# Altium PCB AudioMoth-v1.2.PcbDoc (part 3 of 4)
Units mil, origin at the board's own origin, x right, y up, seen from the top; angles counter-clockwise.
Board outline 4924.42 x 1891.72 mil, 4 copper layers (Top Layer, Layer 1, Layer 2, Bottom Layer), stack 61.651 mil thick; 148 components, 140 nets, 637 pads, 349 vias.
Unrouted connection lines stored in the file: 32.
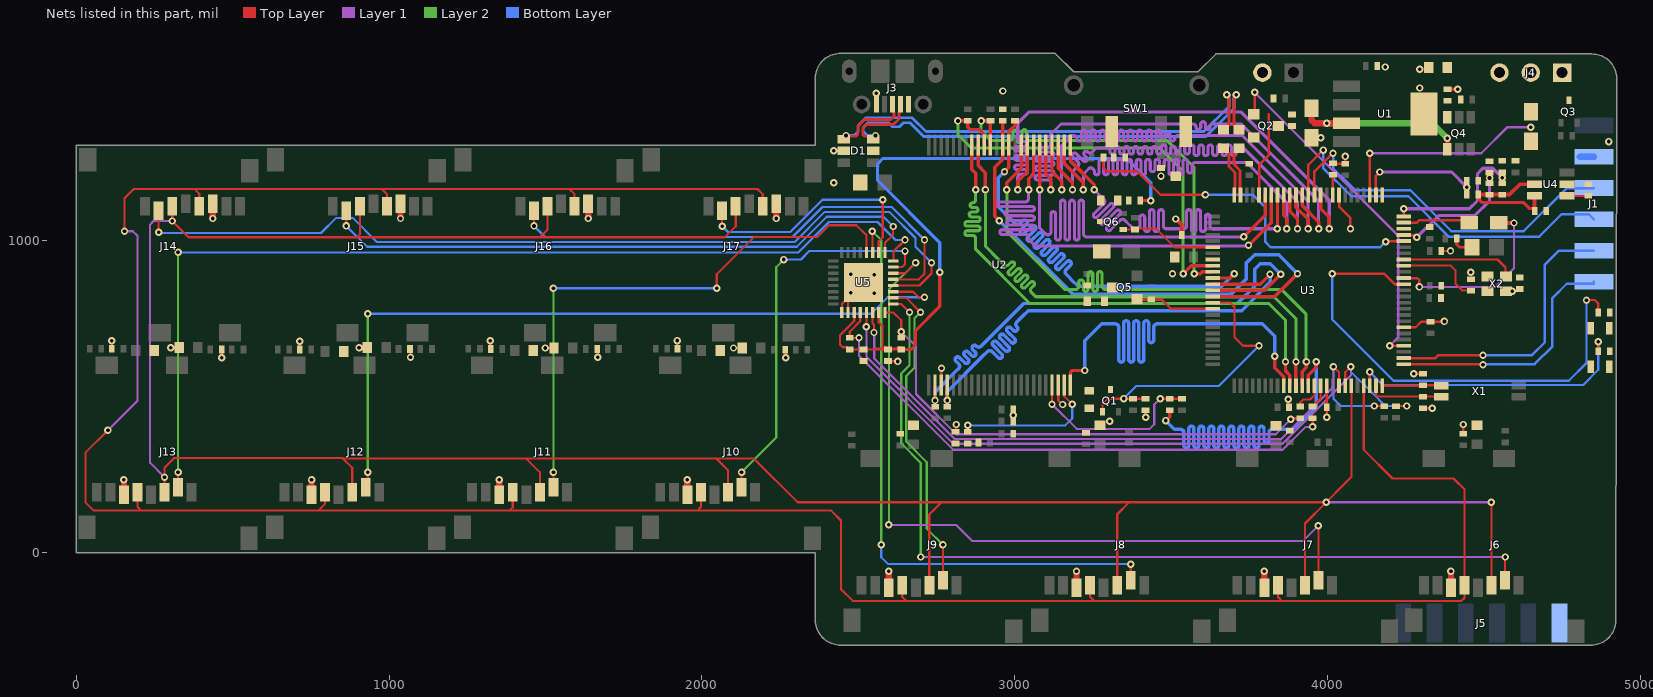
[diagram p4: the nets of this part, all layers, seen from the top]

## Via types
v1: diameter 23.62, hole 11.81, Top Layer to Bottom Layer, tented both sides, 344 vias
v2: diameter 23.62, hole 11.81, Top Layer to Bottom Layer, 5 vias

## Nets (pads, with @x,y where several pads share a name; then routed paths per layer and width w, separated by ;. In a path a pad name is that pad's centre, name@x,y a point inside that pad or via, vN(x,y) a via of type N, cw(c..) or ccw(c..) an arc to the next point about the centre after c; other vN are vias at no path point) (continued)
A8: U2.8 U3.61 | length 1955.1
  Top Layer w11: v1(3009.67,1161.59) 3009.67,1188.32 3040.46,1219.11 U2.8@3040.45,1304.63 ; U3.61@3977.85,1144.84 3977.85,1100.71 4005.67,1072.9 v1(4005.67,1036.57)
  Layer 1 w9.9: v1(3009.67,1161.59) 3009.67,1180.91 3009.67,1200.76 cw(c3019.57,1200.76) 3019.57,1210.66 3032.53,1210.66 ccw(c3032.53,1218.11) 3032.53,1225.56 3007.12,1225.56 cw(c3007.12,1233.01) 3007.12,1240.46 3032.53,1240.46 ccw(c3032.53,1247.91) 3032.53,1255.36 3007.12,1255.36 cw(c3007.12,1262.81) 3007.12,1270.26 3032.53,1270.26 ccw(c3032.53,1277.71) 3032.53,1285.16 3007.12,1285.16 cw(c3007.12,1292.61) 3007.12,1300.06 3032.29,1300.06 ccw(c3032.29,1307.51) 3032.29,1314.96 3019.57,1314.96 cw(c3019.57,1324.86) 3009.67,1324.86 3009.67,1367.08 3009.67,1374.08 3044.9,1409.31 3723.95,1409.31 4005.67,1127.58 v1(4005.67,1036.57)
A9: U2.7 U3.69 | length 1956.7
  Top Layer w11: v1@3044.43,1156.59 v1(3044.43,1161.59) 3044.43,1196.08 3060.14,1211.79 U2.7@3060.14,1304.63 ; v1(3747.54,983.42) 3820.37,1056.25 U3.69@3820.37,1144.84
  Layer 1 w9.9: v1(3044.43,1161.59) 3044.43,1150.78 3044.43,1132.57 cw(c3034.53,1132.57) 3034.53,1122.67 2948.78,1122.67 ccw(c2948.78,1115.22) 2948.78,1107.77 3055.47,1107.77 cw(c3055.47,1100.32) 3055.47,1092.87 2976.29,1092.87 ccw(c2976.29,1085.42) 2976.29,1077.97 3055.47,1077.97 cw(c3055.47,1070.52) 3055.47,1063.07 2982.11,1063.07 ccw(c2982.11,1055.62) 2982.11,1048.17 3055.47,1048.17 cw(c3055.47,1040.72) 3055.47,1033.27 2959.81,1033.27 ccw(c2959.81,1025.82) 2959.81,1018.37 3034.53,1018.37 cw(c3034.53,1008.47) 3044.43,1008.47 3044.43,1003.52 3044.43,1002.8 3066.04,981.19 3745.31,981.19 v1(3747.54,983.42)
A10: U2.6 U3.70 | length 1955.1
  Top Layer w11: v1(3079.82,1161.59) U2.6@3079.82,1304.63 ; v1(3731.9,1011.31) 3800.69,1080.1 U3.70@3800.69,1144.84
  Layer 1 w9.9: v1(3079.82,1161.59) 3079.82,1039.22 3080.82,1038.22 3099.11,1019.92 ccw(c3106.11,1026.92) 3116.01,1026.92 3116.01,1083.46 cw(c3123.46,1083.46) 3130.91,1083.46 3130.91,1007.76 ccw(c3138.36,1007.76) 3145.81,1007.76 3145.81,1120.38 cw(c3153.26,1120.38) 3160.71,1120.38 3160.71,1007.76 ccw(c3168.16,1007.76) 3175.61,1007.76 3175.61,1120.38 cw(c3183.06,1120.38) 3190.51,1120.38 3190.51,1007.76 ccw(c3197.96,1007.76) 3205.41,1007.76 3205.41,1120.38 cw(c3212.86,1120.38) 3220.31,1120.38 3220.31,1020.21 ccw(c3230.21,1020.21) 3230.21,1010.31 3250.06,1010.31 3730.9,1010.31 v1(3731.9,1011.31)
A11: U2.5 U3.64 | length 1960.1
  Top Layer w11: U2.5@3099.51,1304.63 3099.51,1211.79 3115.22,1196.08 v1(3115.22,1161.59) v1@3115.22,1156.59 ; U3.64@3918.8,1144.84 3918.8,1110.81 3971.78,1057.83 v1(3971.78,1036.57)
  Layer 1 w9.9: v1(3115.22,1161.59) 3115.22,1177.75 3115.22,1182.7 ccw(c3105.32,1182.7) 3105.32,1192.6 3072.77,1192.6 cw(c3072.77,1200.05) 3072.77,1207.5 3117.77,1207.5 ccw(c3117.77,1214.95) 3117.77,1222.4 3072.77,1222.4 cw(c3072.77,1229.85) 3072.77,1237.3 3117.77,1237.3 ccw(c3117.77,1244.75) 3117.77,1252.2 3072.77,1252.2 cw(c3072.77,1259.65) 3072.77,1267.1 3117.77,1267.1 ccw(c3117.77,1274.55) 3117.77,1282 3085.09,1282 cw(c3085.09,1289.45) 3085.09,1296.9 3105.32,1296.9 ccw(c3105.32,1306.8) 3115.22,1306.8 3115.22,1338.63 3117.54,1340.95 3148.1,1371.51 3550.05,1371.51 3569.9,1371.51 cw(c3569.9,1361.61) 3579.8,1361.61 ccw(c3587.25,1361.61) 3594.7,1361.61 3594.7,1371.51 cw(c3602.15,1371.51) 3609.6,1371.51 3609.6,1361.61 ccw(c3617.05,1361.61) 3624.5,1361.61 cw(c3634.4,1361.61) 3634.4,1371.51 3684.78,1371.51 3724.69,1371.51 3971.78,1124.42 v1(3971.78,1036.57)
A12: U2.4 U3.65 | length 1955.8
  Top Layer w11: U2.4@3119.19,1304.63 3119.19,1219.11 3149.98,1188.32 v1(3149.98,1161.59) ; U3.65@3899.11,1144.84 3899.11,1105.04 3937.89,1066.27 v1(3937.89,1036.57)
  Layer 1 w9.9: v1(3149.98,1161.59) 3149.98,1301.89 3175.18,1327.09 3182.66,1334.57 3188.86,1334.57 cw(c3188.86,1324.67) 3198.76,1324.67 3198.76,1323.94 ccw(c3206.21,1323.94) 3213.66,1323.94 3213.66,1344.26 cw(c3221.11,1344.26) 3228.56,1344.26 3228.56,1323.94 ccw(c3236.01,1323.94) 3243.46,1323.94 3243.46,1344.26 cw(c3250.91,1344.26) 3258.36,1344.26 3258.36,1323.94 ccw(c3265.81,1323.94) 3273.26,1323.94 3273.26,1344.26 cw(c3280.71,1344.26) 3288.16,1344.26 3288.16,1323.94 ccw(c3295.61,1323.94) 3303.06,1323.94 3303.06,1344.26 cw(c3310.51,1344.26) 3317.96,1344.26 3317.96,1323.94 ccw(c3325.41,1323.94) 3332.86,1323.94 3332.86,1344.26 cw(c3340.31,1344.26) 3347.76,1344.26 3347.76,1323.94 ccw(c3355.21,1323.94) 3362.66,1323.94 3362.66,1344.26 cw(c3370.11,1344.26) 3377.56,1344.26 3377.56,1323.94 ccw(c3385.01,1323.94) 3392.46,1323.94 3392.46,1344.26 cw(c3399.91,1344.26) 3407.36,1344.26 3407.36,1323.94 ccw(c3414.81,1323.94) 3422.26,1323.94 3422.26,1344.26 cw(c3429.71,1344.26) 3437.16,1344.26 3437.16,1323.94 ccw(c3444.61,1323.94) 3452.06,1323.94 3452.06,1344.26 cw(c3459.51,1344.26) 3466.96,1344.26 3466.96,1332.84 ccw(c3474.41,1332.84) 3481.86,1332.84 3481.86,1334.57 cw(c3489.31,1334.57) 3496.76,1334.57 3496.76,1324.67 ccw(c3504.21,1324.67) 3511.66,1324.67 cw(c3521.56,1324.67) 3521.56,1334.57 3550.05,1334.57 3727.63,1334.57 3937.89,1124.32 v1(3937.89,1036.57)
A13: U2.3 U3.66 | length 1955.1
  Top Layer w11: U2.3@3138.88,1304.63 3138.88,1229.57 3184.74,1183.71 v1(3184.74,1161.59) ; U3.66@3879.43,1144.84 3879.43,1092.58 3903.99,1068.02 v1(3903.99,1036.57)
  Layer 1 w9.9: v1(3184.74,1161.59) 3184.74,1219.15 3198.44,1232.85 3201.94,1236.35 ccw(c3194.94,1243.35) 3201.94,1250.35 3186.36,1265.94 cw(c3191.63,1271.21) 3186.36,1276.47 cw(c3191.63,1271.21) 3196.89,1276.47 3219.48,1253.89 ccw(c3224.75,1259.16) 3230.02,1253.89 ccw(c3224.75,1259.16) 3230.02,1264.42 3223.01,1271.43 cw(c3228.28,1276.69) 3223.01,1281.96 cw(c3228.28,1276.69) 3233.55,1281.96 ccw(c3240.55,1288.96) 3247.55,1281.96 3259.9,1294.31 3269.43,1294.31 3275.4,1294.31 3295.25,1294.31 cw(c3295.25,1284.41) 3305.15,1284.41 3305.15,1282.66 ccw(c3312.6,1282.66) 3320.05,1282.66 3320.05,1292.14 cw(c3327.5,1292.14) 3334.95,1292.14 3334.95,1282.66 ccw(c3342.4,1282.66) 3349.85,1282.66 3349.85,1292.14 cw(c3357.3,1292.14) 3364.75,1292.14 3364.75,1282.66 ccw(c3372.2,1282.66) 3379.65,1282.66 3379.65,1292.14 cw(c3387.1,1292.14) 3394.55,1292.14 3394.55,1282.66 ccw(c3402,1282.66) 3409.45,1282.66 3409.45,1292.14 cw(c3416.9,1292.14) 3424.35,1292.14 3424.35,1282.66 ccw(c3431.8,1282.66) 3439.25,1282.66 3439.25,1292.14 cw(c3446.7,1292.14) 3454.15,1292.14 3454.15,1282.66 ccw(c3461.6,1282.66) 3469.05,1282.66 3469.05,1296.86 cw(c3476.5,1296.86) 3483.95,1296.86 3483.95,1282.66 ccw(c3491.4,1282.66) 3498.85,1282.66 3498.85,1292.87 cw(c3506.3,1292.87) 3513.75,1292.87 3513.75,1282.66 ccw(c3521.2,1282.66) 3528.65,1282.66 3528.65,1296.86 cw(c3536.1,1296.86) 3543.55,1296.86 3543.55,1282.66 ccw(c3551,1282.66) 3558.45,1282.66 3558.45,1296.86 cw(c3565.9,1296.86) 3573.35,1296.86 3573.35,1277.64 ccw(c3580.8,1277.64) 3588.25,1277.64 3588.25,1296.86 cw(c3595.7,1296.86) 3603.15,1296.86 3603.15,1277.64 ccw(c3610.6,1277.64) 3618.05,1277.64 3618.05,1296.86 cw(c3625.5,1296.86) 3632.95,1296.86 3632.95,1277.64 ccw(c3640.4,1277.64) 3647.85,1277.64 3647.85,1296.86 cw(c3655.3,1296.86) 3662.75,1296.86 3662.75,1277.64 ccw(c3670.2,1277.64) 3677.65,1277.64 3677.65,1296.86 cw(c3685.1,1296.86) 3692.55,1296.86 3692.55,1277.64 ccw(c3700,1277.64) 3707.45,1277.64 3707.45,1284.41 cw(c3717.35,1284.41) 3717.35,1294.31 3732.54,1294.31 3759.65,1267.2 3903.99,1122.86 v1(3903.99,1036.57)
A14: U2.2 U3.67 | length 1955.1
  Top Layer w11: U2.2@3158.56,1304.63 3158.56,1245.26 3219.5,1184.32 v1(3219.5,1161.59) ; U3.67@3859.74,1144.84 3859.74,1080.07 3870.1,1069.71 v1(3870.1,1036.57)
  Layer 1 w9.9: v1(3219.5,1161.59) 3219.5,1211.22 3230.96,1222.67 3239.64,1231.35 cw(c3241.82,1218.82) 3254.54,1218.87 3254.54,1216.65 ccw(c3261.99,1216.65) 3269.44,1216.65 3269.44,1250.86 cw(c3276.89,1250.86) 3284.34,1250.86 3284.34,1216.65 ccw(c3291.79,1216.65) 3299.24,1216.65 3299.24,1250.86 cw(c3306.69,1250.86) 3314.14,1250.86 3314.14,1216.65 ccw(c3321.59,1216.65) 3329.04,1216.65 3329.04,1250.86 cw(c3336.49,1250.86) 3343.94,1250.86 3343.94,1216.65 ccw(c3351.39,1216.65) 3358.84,1216.65 3358.84,1250.86 cw(c3366.29,1250.86) 3373.74,1250.86 3373.74,1216.65 ccw(c3381.19,1216.65) 3388.64,1216.65 3388.64,1250.86 cw(c3396.09,1250.86) 3403.54,1250.86 3403.54,1216.65 ccw(c3410.99,1216.65) 3418.44,1216.65 3418.44,1250.86 cw(c3425.89,1250.86) 3433.34,1250.86 3433.34,1226.64 ccw(c3440.79,1226.64) 3448.24,1226.64 3448.24,1250.86 cw(c3455.69,1250.86) 3463.14,1250.86 3463.14,1236.19 ccw(c3470.59,1236.19) 3478.04,1236.19 3478.04,1250.86 cw(c3485.49,1250.86) 3492.94,1250.86 3492.94,1216.65 ccw(c3500.39,1216.65) 3507.84,1216.65 3507.84,1250.86 cw(c3515.29,1250.86) 3522.74,1250.86 3522.74,1216.65 ccw(c3530.19,1216.65) 3537.64,1216.65 3537.64,1250.86 cw(c3545.09,1250.86) 3552.54,1250.86 3552.54,1222.18 ccw(c3559.99,1222.18) 3567.44,1222.18 3567.44,1238.41 cw(c3577.34,1238.41) 3577.34,1248.31 3741.28,1248.31 3749.37,1240.22 3870.1,1119.49 v1(3870.1,1036.57)
A15: U2.1 U3.68 | length 1956.6
  Top Layer w11: U2.1@3178.25,1304.63 3178.25,1253.05 3254.26,1177.03 v1(3254.26,1161.59) ; v1@3836.21,1036.57 3840.06,1040.42 U3.68@3840.06,1144.84
  Layer 1 w9.9: v1(3254.26,1161.59) 3271.14,1144.71 3274.64,1141.21 3285.18,1130.68 cw(c3278.18,1123.67) 3285.18,1116.67 3253.39,1084.88 ccw(c3258.65,1079.61) 3253.39,1074.35 ccw(c3258.65,1079.61) 3263.92,1074.35 3304.52,1114.94 cw(c3309.79,1109.67) 3315.06,1114.94 cw(c3309.79,1109.67) 3315.06,1104.41 3274.46,1063.81 ccw(c3279.73,1058.54) 3274.46,1053.27 ccw(c3279.73,1058.54) 3284.99,1053.27 3325.59,1093.87 cw(c3330.86,1088.6) 3336.13,1093.87 cw(c3330.86,1088.6) 3336.13,1083.33 3295.8,1043.01 ccw(c3301.07,1037.74) 3295.8,1032.47 ccw(c3301.07,1037.74) 3306.34,1032.47 3337.86,1063.99 cw(c3344.86,1056.99) 3351.86,1064 3363.9,1051.96 3367.4,1048.46 3379.29,1036.57 3385.85,1036.57 3390.8,1036.57 ccw(c3390.8,1046.47) 3400.7,1046.47 3400.7,1072.91 cw(c3408.15,1072.91) 3415.6,1072.91 3415.6,1034.66 ccw(c3423.05,1034.66) 3430.5,1034.66 3430.5,1090.21 cw(c3437.95,1090.21) 3445.4,1090.21 3445.4,1034.66 ccw(c3452.85,1034.66) 3460.3,1034.66 3460.3,1090.21 cw(c3467.75,1090.21) 3475.2,1090.21 3475.2,1046.47 ccw(c3485.1,1046.47) 3485.1,1036.57 3539.8,1036.57 ccw(c3539.8,1046.47) 3549.7,1046.47 3549.7,1090.21 cw(c3557.15,1090.21) 3564.6,1090.21 3564.6,1034.66 ccw(c3572.05,1034.66) 3579.5,1034.66 3579.5,1090.21 cw(c3586.95,1090.21) 3594.4,1090.21 3594.4,1034.66 ccw(c3601.85,1034.66) 3609.3,1034.66 3609.3,1075.4 cw(c3616.75,1075.4) 3624.2,1075.4 3624.2,1046.47 ccw(c3634.1,1046.47) 3634.1,1036.57 3839.07,1036.57 v1(3839.21,1036.57)
A16: U2.48 U3.9 | length 1853.1
  Top Layer w11: U2.48@3178.25,536.92 3178.25,577.79 3183.76,583.31 v1(3223.9,583.31) ; v1(3830.87,628.78) 3830.87,591.82 3859.74,562.94 U3.9@3859.74,534.6
  Bottom Layer w11: v1(3223.9,583.31) 3223.9,678.28 3277.92,732.31 3299.9,732.31 3321.4,732.31 cw(c3321.4,721.31) 3332.4,721.31 3332.4,618.3 ccw(c3340.4,618.3) 3348.4,618.3 3348.4,734.31 cw(c3356.4,734.31) 3364.4,734.31 3364.4,618.3 ccw(c3372.4,618.3) 3380.4,618.3 3380.4,734.31 cw(c3388.4,734.31) 3396.4,734.31 3396.4,618.3 ccw(c3404.4,618.3) 3412.4,618.3 3412.4,734.31 cw(c3420.4,734.31) 3428.4,734.31 3428.4,680.71 ccw(c3436.4,680.71) 3444.4,680.71 3444.4,721.31 cw(c3455.4,721.31) 3455.4,732.31 3500.65,732.31 3790.9,732.31 3830.87,692.33 v1(3830.87,628.78)
A17: U2.17 U3.10 | length 1871.6
  Top Layer w11: U2.17@2863.29,1304.63 2863.29,1225.96 2874.99,1214.26 v1(2874.99,1161.59) ; v1(3865.65,611.76) 3865.65,582.49 3879.43,568.71 U3.10@3879.43,534.6
  Layer 2 w9.9: v1(2874.99,1161.59) 2874.99,1151.16 2874.99,1129.32 cw(c2865.09,1129.32) 2865.09,1119.42 ccw(c2865.09,1111.97) 2865.09,1104.52 2874.99,1104.52 cw(c2874.99,1097.07) 2874.99,1089.62 2862.05,1089.62 ccw(c2862.05,1082.17) 2862.05,1074.72 2882.04,1074.72 cw(c2882.04,1067.27) 2882.04,1059.82 2847.93,1059.82 ccw(c2847.93,1052.37) 2847.93,1044.92 2882.04,1044.92 cw(c2882.04,1037.47) 2882.04,1030.02 2847.93,1030.02 ccw(c2847.93,1022.57) 2847.93,1015.12 2865.09,1015.12 cw(c2865.09,1005.22) 2874.99,1005.22 2874.99,1000.27 2874.99,970.91 3048.27,797.63 3812.32,797.63 3865.65,744.3 v1(3865.65,611.76)
A18: U2.16 U3.11 | length 1874.3
  Top Layer w11: U2.16@2882.97,1304.63 2882.97,1238.79 2906.39,1215.37 v1@2906.39,1155.55 ; U3.11@3899.11,534.6 v1(3899.11,611.76)
  Layer 2 w9.9: v1(2906.39,1161.59) 2906.39,980.13 2949.48,937.03 2952.98,933.53 2965.62,920.89 ccw(c2972.62,927.89) 2979.62,920.89 2987.18,928.45 cw(c2992.45,923.19) 2997.72,928.45 cw(c2992.45,923.19) 2997.72,917.92 2981.36,901.55 ccw(c2986.62,896.28) 2981.36,891.02 ccw(c2986.62,896.28) 2991.89,891.02 3008.26,907.38 cw(c3013.52,902.11) 3018.79,907.38 cw(c3013.52,902.11) 3018.79,896.85 3002.43,880.48 ccw(c3007.7,875.21) 3002.43,869.95 ccw(c3007.7,875.21) 3012.96,869.95 3029.33,886.31 cw(c3034.6,881.04) 3039.86,886.31 cw(c3034.6,881.04) 3039.86,875.77 3023.5,859.41 ccw(c3028.77,854.14) 3023.5,848.87 ccw(c3028.77,854.14) 3034.03,848.87 3050.4,865.24 cw(c3055.67,859.97) 3060.94,865.24 cw(c3055.67,859.97) 3060.94,854.7 3053.37,847.14 ccw(c3060.37,840.14) 3053.37,833.14 3063.91,822.6 3067.41,819.1 3829.19,819.1 3899.11,749.18 v1(3899.11,611.76)
A19: U2.9 U3.12 | length 1869.9
  Top Layer w11: v1(2974.91,1161.59) 2974.91,1183.71 3020.77,1229.57 U2.9@3020.77,1304.63 ; U3.12@3918.8,534.6 3918.8,579.71 3932.58,593.49 v1(3932.58,611.76)
  Layer 2 w9.9: v1(2974.91,1161.59) 2974.91,1027.75 3159.88,842.78 3170.42,842.78 3194.93,842.78 ccw(c3194.93,852.68) 3204.83,852.68 3204.83,865.73 cw(c3212.28,865.73) 3219.73,865.73 3219.73,843.45 ccw(c3227.18,843.45) 3234.63,843.45 3234.63,891.84 cw(c3242.08,891.84) 3249.53,891.84 3249.53,843.45 ccw(c3256.98,843.45) 3264.43,843.45 3264.43,891.84 cw(c3271.88,891.84) 3279.33,891.84 3279.33,852.68 ccw(c3289.23,852.68) 3289.23,842.78 3309.08,842.78 3852.53,842.78 3930.9,764.41 v1@3930.9,611.76
A20: R8.1 U3.13 | length 1853.1
  Top Layer w11: v1(3482.93,423.24) 3483.4,422.78 3495.9,435.28 R8.1@3495.9,456.31 ; U3.13@3938.48,534.6 3938.48,568.71 3964.07,594.3 v1(3964.07,611.76)
  Bottom Layer w11: v1(3482.93,423.24) 3508.4,397.78 3510.87,395.31 3529.9,395.31 cw(c3529.9,384.31) 3540.9,384.31 3540.9,344.42 ccw(c3548.9,344.42) 3556.9,344.42 3556.9,397.31 cw(c3564.9,397.31) 3572.9,397.31 3572.9,344.42 ccw(c3580.9,344.42) 3588.9,344.42 3588.9,397.31 cw(c3596.9,397.31) 3604.9,397.31 3604.9,344.42 ccw(c3612.9,344.42) 3620.9,344.42 3620.9,397.31 cw(c3628.9,397.31) 3636.9,397.31 3636.9,344.42 ccw(c3644.9,344.42) 3652.9,344.42 3652.9,397.31 cw(c3660.9,397.31) 3668.9,397.31 3668.9,344.42 ccw(c3676.9,344.42) 3684.9,344.42 3684.9,397.31 cw(c3692.9,397.31) 3700.9,397.31 3700.9,344.42 ccw(c3708.9,344.42) 3716.9,344.42 3716.9,397.31 cw(c3724.9,397.31) 3732.9,397.31 3732.9,344.42 ccw(c3740.9,344.42) 3748.9,344.42 3748.9,397.31 cw(c3756.9,397.31) 3764.9,397.31 3764.9,344.42 ccw(c3772.9,344.42) 3780.9,344.42 3780.9,397.31 cw(c3788.9,397.31) 3796.9,397.31 3796.9,361.06 ccw(c3804.9,361.06) 3812.9,361.06 3812.9,384.31 cw(c3823.9,384.31) 3823.9,395.31 3889.43,395.31 3899.98,405.85 3964.07,469.95 v1(3964.07,611.76)
AGND: C7.1 C9.1 C10.1 C12.1 C13.1 C15.1 C16.1 C18.1 C20.1 J4.3 R11.2 U3.48 U3.51 U4.2 | length 0.8
  Top Layer w8: C9.1@4327,1042.07 C9.1@4327.56,1041.52
BAT_ACMP_V: R5.1 R6.2 U3.71 | length 270.2
  Top Layer w8: U3.71@3781,1144.84 3781,1240.23 3812.75,1271.97 3812.75,1401.85
BAT_MON_EN: Q2.1 U3.29 | length 1126.4
  Top Layer w8: Q2.1@3767.22,1402.63 v1(3767.22,1473.07) ; v1(4198.89,662.55) U3.29@4243.6,662.55
  Layer 1 w8: v1(3767.22,1473.07) 4225.4,1014.89 4225.4,689.07 v1(4198.89,662.55)
CPU_FET_IO_EXP_EN_N: Q6.1 R43.2 U3.81 | length 311.8
  Top Layer w7: Q6.1@3346.78,1033.84 3347.29,1034.34 R43.2@3384.4,1034.34 ; R43.2@3384.4,1037.84 3450.89,1037.84 3511.22,977.51 U3.81@3633.37,977.51
CPU_FET_SD_EN_N: Q5.1 R38.2 U3.91 | length 268.1
  Top Layer w8: Q5.1@3405.63,808.91 3471.33,808.91 3499.58,780.66 U3.91@3633.37,780.66 ; 3414.98,808.91 3423.54,808.91 3427.97,808.91 R38.2@3443.65,808.91
CPU_FET_SRAM_EN_N: Q1.1 R1.2 R2.2 U3.90 | length 944.3
  Top Layer w7: Q1.1@3280.28,450.95 3280.28,476.19 3297.4,493.31 v1@3348.24,493.31 ; v1(3348.24,493.62) v1@3348.24,493.31 ; v1@3354.77,493.31 3348.55,493.31 v1@3348.24,493.31 ; U3.90@3633.37,800.35 3688.87,800.35 3702.65,786.57 3702.65,690.03 3730.12,662.55 v1(3781,662.55)
  Top Layer w8: v1(3348.24,493.62) 3348.55,493.31 3351.66,490.2 3354.77,493.31 R1.2@3378.33,493.31 R2.2@3418,493.31
  Layer 2 w7: v1@3780.54,662.09 v1(3781,662.55)
  Bottom Layer w7: v1(3348.24,493.62) 3388.27,533.66 3652.11,533.66 v1(3781,662.55)
CPU_LB: R21.2 U2.15 U3.84 | length 1392.5
  Top Layer w11: v1(2818.41,1381.25) R21.2@2849.95,1381.25 2849.95,1361.64 2857.78,1353.81 2886.2,1353.81 2902.65,1337.37 U2.15@2902.66,1304.63 ; v1(3538.4,892.23) 3564.55,918.46 U3.84@3633.37,918.46
  Layer 2 w9.9: v1(2818.41,1381.25) 2818.41,1337.61 2861.72,1294.31 3463.9,1294.31 3538.4,1219.81 v1(3538.4,892.23)
CPU_SD_CLK: J6.5 J7.5 J8.5 J9.5 J10.5 J11.5 J12.5 J13.5 J14.5 J15.5 J16.5 J17.5 U3.22 | length 9377.7
  Top Layer w7: v1(100.9,392.31) 28.9,320.31 28.9,162.37 55.96,135.31 207.9,135.31 ; v1(153.87,1028.78) 153.87,1133.7 183.75,1163.58 378.24,1163.58 ; J13.5@195.32,194.37 195.32,147.88 207.9,135.31 ; J14.5@392.99,1109.24 392.99,1148.84 378.24,1163.58 ; J12.5@795.32,194.37 795.32,156.97 773.66,135.31 ; J15.5@992.99,1109.24 992.99,1146.64 976.05,1163.58 ; J11.5@1395.32,194.37 1395.32,145.85 1384.78,135.31 ; J16.5@1592.99,1109.24 1592.99,1146.64 1576.05,1163.58 ; J10.5@1996.78,194.37 1996.78,147.31 1984.78,135.31 ; J17.5@2194.45,1109.24 2194.45,1146.64 2177.51,1163.58 1576.05,1163.58 ; J9.5@2640.56,-103.22 2640.56,-140.63 2653.16,-153.22 ; J8.5@3241,-103.22 3241,-140.63 3253.6,-153.22 ; J7.5@3841.43,-103.22 3841.43,-140.63 3854.03,-153.22 ; U3.22@4115.65,534.6 4115.65,330.39 4207.73,238.31 4402.92,238.31 4437.89,203.34 J6.5@4437.89,-103.22 4437.89,-143.86 4428.53,-153.22 3854.03,-153.22 ; 207.9,135.31 773.66,135.31 ; 378.24,1163.58 976.05,1163.58 ; 773.66,135.31 1384.78,135.31 ; 976.05,1163.58 1576.05,1163.58 ; 1384.78,135.31 1984.78,135.31 ; 1984.78,135.31 2413.65,135.31 2444.9,104.06 2444.9,-115.83 2482.3,-153.22 2653.16,-153.22 ; 2653.16,-153.22 3253.6,-153.22 ; 3253.6,-153.22 3854.03,-153.22
  Layer 1 w7: v1(100.9,392.31) 195.32,486.73 195.32,1013.88 180.43,1028.78 v1(153.87,1028.78)
CPU_SD_CS_1: J6.2 U5.1 | length 2824.6
  Top Layer w7: U5.1@2612.11,795.89 2637.3,795.89 v1(2663.45,769.74) ; J6.2@4567.81,-87.48 4567.87,-87.42 v1(4567.87,-12.69)
  Layer 1 w7: v1(2699.62,-12.69) v1(4567.87,-12.69)
  Layer 2 w7: v1(2663.45,769.74) 2663.45,600.44 2636.99,573.98 2636.99,350.54 2699.62,287.92 v1(2699.62,-12.69)
CPU_SD_CS_2: J9.2 U5.2 | length 1030.4
  Top Layer w7: U5.2@2612.11,815.57 2652.92,815.57 v1(2698.76,769.74) ; J9.2@2770.48,-87.48 v1(2770.48,26.31)
  Layer 2 w7: v1(2698.76,769.74) 2679.4,750.38 2679.4,591.88 2653.13,565.6 2653.13,356.14 2719,290.27 2719,77.79 v1(2770.48,26.31)
CPU_SD_CS_3: J12.2 U5.3 | length 2466.2
  Top Layer w7: J12.2@925.24,210.12 931.89,216.77 v1(931.89,257.66) ; U5.3@2612.11,835.26 2675.01,835.26 2692.76,817.51 v1(2711.71,817.51)
  Layer 2 w7: v1(931.89,257.66) v1(931.89,765.09)
  Bottom Layer w7: v1(931.89,765.09) 2541.24,765.09 2593.66,817.51 v1(2711.71,817.51)
CPU_SD_CS_4: J14.2 U5.4 | length 2887.7
  Top Layer w7: v1(263.07,1025.58) J14.2@263.07,1093.49 ; U5.4@2612.11,854.94 2695.5,854.94 2734.02,893.47 v1(2734.02,927.71)
  Bottom Layer w7: v1(263.07,1025.58) 265.96,1022.69 781.9,1022.69 830.48,1071.27 883.48,1071.27 960.28,994.47 2296.5,994.47 2392.46,1090.44 2599.34,1090.44 2682.92,1006.85 2682.92,978.81 v1(2734.02,927.71)
CPU_SD_CS_5: J16.2 U5.5 | length 1609.7
  Top Layer w7: v1(1463.07,1045.58) J16.2@1463.07,1093.49 ; U5.5@2612.11,874.63 2693.66,874.63 2711.71,892.68 v1(2711.71,1000.89)
  Bottom Layer w7: v1(1463.07,1045.58) 1498.31,1010.34 2289.39,1010.34 2385.17,1106.12 2606.48,1106.12 v1(2711.71,1000.89)
CPU_SD_CS_6: J7.2 U5.6 | length 2546.7
  Top Layer w7: U5.6@2612.11,894.31 2649.6,894.31 v1(2683,927.71) ; v1(3970.87,86.78) 3970.87,-86.99 J7.2@3971.35,-87.48
  Layer 1 w7: v1(2597.68,89.85) 2812.04,89.85 2863.22,38.67 3922.76,38.67 v1(3970.87,86.78)
  Layer 2 w7: v1(2597.68,89.85) 2597.68,842.39 v1(2683,927.71)
CPU_SD_CS_7: J10.2 U5.7 | length 1265.7
  Top Layer w7: J10.2@2126.7,210.12 v1(2126.7,258.04) ; U5.7@2612.11,914 2640.37,914 2649.38,923 v1(2649.38,965.11)
  Layer 2 w7: v1(2126.7,258.04) 2237.72,369.06 2237.72,913.78 v1(2262.01,938.06)
  Bottom Layer w7: v1(2262.01,938.06) 2316.5,938.06 2343.55,965.11 v1(2649.38,965.11)
CPU_SD_CS_8: J13.2 U5.8 | length 3221.9
  Top Layer w7: J13.2@325.24,210.12 v1(325.24,258.04) ; U5.8@2612.11,933.68 2612.11,963.62 v1(2649.38,1000.89)
  Layer 2 w7: v1(325.24,258.04) v1(325.24,961)
  Bottom Layer w7: v1(325.24,961) 2308.92,961 2406.36,1058.45 2561.37,1058.45 2618.93,1000.89 v1(2649.38,1000.89)
CPU_SD_CS_9: J15.2 U5.9 | length 1970.1
  Top Layer w7: v1(863.07,1045.58) J15.2@863.07,1093.49 ; U5.9@2585.14,960.65 2585.14,991.63 2611.23,1017.71 v1(2611.23,1043.71)
  Bottom Layer w7: v1(863.07,1045.58) 929.77,978.87 2303.22,978.87 2399.1,1074.75 2580.19,1074.75 v1(2611.23,1043.71)
CPU_SD_CS_10: J17.2 U5.10 | length 786.9
  Top Layer w7: v1(2064.53,1045) J17.2@2064.53,1093.49 ; U5.10@2565.46,960.65 2565.46,997.01 2578.1,1009.65 v1(2578.1,1129.52)
  Bottom Layer w7: v1(2064.53,1045) 2083.53,1026 2282.13,1026 2385.65,1129.52 v1(2578.1,1129.52)
CPU_SD_CS_11: J8.2 U5.11 | length 1981.5
  Top Layer w7: v1(2545,1029) 2545.77,1028.23 U5.11@2545.77,960.65 ; J8.2@3370.92,-87.48 v1(3370.92,-35.64)
  Layer 2 w7: v1(2545,1029) 2573.21,1000.79 v1(2573.21,26.31)
  Bottom Layer w7: v1(2573.21,26.31) 2573.21,-13.43 2595.41,-35.64 v1(3370.92,-35.64)
CPU_SD_CS_12: J11.2 U5.12 | length 1814.9
  Top Layer w7: J11.2@1525.24,210.12 v1(1525.24,258.04) ; v1(2047.67,846.59) 2047.67,891.43 2166.07,1009.83 2368.26,1009.83 2406.2,1047.77 2493.68,1047.77 2526.09,1015.36 U5.12@2526.09,960.65
  Layer 2 w7: v1(1525.24,258.04) v1(1525.24,846.27)
  Bottom Layer w7: v1(1525.24,846.27) 1525.4,846.43 2047.51,846.43 v1(2047.67,846.59)
CPU_SD_MOSI: J6.3 J7.3 J8.3 J9.3 J10.3 J11.3 J12.3 J13.3 J14.3 J15.3 J16.3 J17.3 U3.20 | length 9357.1
  Top Layer w7: J13.3@281.93,194.37 v1(281.93,242.29) 281.93,272.34 313.02,303.43 850.78,303.43 852.58,301.63 ; J14.3@306.38,1109.24 v1(306.38,1061.32) 358.39,1009.31 896.9,1009.31 ; J12.3@881.93,194.37 881.93,272.27 852.58,301.63 ; J15.3@906.38,1109.24 906.38,1018.79 896.9,1009.31 ; J11.3@1481.93,194.37 1481.93,258.04 1438.34,301.63 ; J16.3@1506.38,1109.24 1506.38,1033.78 1481.91,1009.31 ; J10.3@2083.39,194.37 2083.39,264.81 2046.58,301.63 ; J17.3@2107.83,1109.24 2107.83,1044.12 2073.02,1009.31 1481.91,1009.31 ; J9.3@2727.18,-103.22 2726.54,-102.59 2726.54,122.78 2766.05,162.29 ; 3326.97,122.78 3366.16,161.96 ; J8.3@3327.61,-103.22 3327.61,122.14 ; J7.3@3928.05,-103.22 3928.05,94.52 v1(3995.81,162.29) ; 4056.06,222.53 4052.97,219.44 ; U3.20@4076.28,534.6 4076.28,242.75 4052.97,219.44 ; J6.3@4524.51,-103.22 v1@4524.51,162.29 ; 852.58,301.63 1438.34,301.63 ; 896.9,1009.31 1481.91,1009.31 ; 1438.34,301.63 2046.58,301.63 ; 2046.58,301.63 2166.79,301.63 2306.13,162.29 2766.05,162.29 ; 2766.05,162.29 v1(3995.81,162.29) ; v1(3995.81,162.29) 4052.97,219.44
  Layer 1 w7: v1(281.93,242.29) 235.9,288.33 235.9,1050.35 246.87,1061.32 v1(306.38,1061.32) ; v1(3995.81,162.29) v1(4523.87,162.29)
CPU_SRAM_CS0: R22.2 U2.26 U3.88 | length 1793.4
  Top Layer w11: U2.26@2745.18,536.92 v1(2745.18,487.76) 2745.18,468.17 R22.2@2746.09,467.26 ; U3.88@3633.37,839.72 3799.72,839.72 v1(3850.64,890.65)
  Bottom Layer w11: v1(2745.18,487.76) 2745.18,514.13 2816.65,585.6 2820.54,589.49 ccw(c2812.76,597.27) 2820.54,605.05 2812.13,613.46 cw(c2817.79,619.11) 2812.13,624.77 cw(c2817.79,619.11) 2823.45,624.77 2840.02,608.2 ccw(c2845.68,613.86) 2851.33,608.2 ccw(c2845.68,613.86) 2851.33,619.51 2839.73,631.11 cw(c2845.39,636.77) 2839.73,642.43 cw(c2845.39,636.77) 2851.04,642.43 2862.26,631.21 ccw(c2867.92,636.87) 2873.58,631.21 ccw(c2867.92,636.87) 2873.58,642.52 2865.8,650.3 cw(c2871.45,655.96) 2865.8,661.62 cw(c2871.45,655.96) 2877.11,661.62 ccw(c2884.89,669.39) 2892.67,661.62 3028.57,797.52 3028.68,797.63 3711.95,797.63 3766.9,852.58 3766.9,907.25 3784.52,924.87 3816.42,924.87 v1(3850.64,890.65)
CPU_SRAM_CS1: R10.2 U2.12 U3.89 | length 1793.4
  Top Layer w11: v1(2950.9,1062.31) 2935.9,1077.31 2935.9,1232.86 2961.71,1258.67 U2.12@2961.71,1304.63 R10.2@2961.71,1381.25 ; U3.89@3633.37,820.03 3831.16,820.03 v1(3903.99,892.87)
  Bottom Layer w11: v1(2950.9,1062.31) 3185.29,827.91 3692.28,827.91 3740.9,876.53 3740.9,927.21 3766.9,953.21 3843.65,953.21 v1(3903.99,892.87)
CPU_SRAM_OE_N: R23.2 U2.28 U3.87 | length 1793.4
  Top Layer w11: R23.2@2784.55,467.26 v1(2784.55,487.76) U2.28@2784.55,536.92 ; U3.87@3633.37,859.4 3785.17,859.4 3816.42,890.65 3816.34,890.72 v1(3816.26,890.65)
  Bottom Layer w11: v1(2784.55,487.76) 2784.55,515.96 2897.11,628.52 2912.31,643.73 cw(c2920.09,635.95) 2927.87,643.73 2947.12,624.47 ccw(c2952.78,630.13) 2958.44,624.47 ccw(c2952.78,630.13) 2958.44,635.78 2931.02,663.2 cw(c2936.68,668.86) 2931.02,674.51 cw(c2936.68,668.86) 2942.33,674.51 2969.75,647.1 ccw(c2975.41,652.76) 2981.06,647.1 ccw(c2975.41,652.76) 2981.06,658.41 2953.65,685.83 cw(c2959.31,691.49) 2953.65,697.14 cw(c2959.31,691.49) 2964.96,697.14 2988.63,673.47 ccw(c2994.29,679.13) 2999.95,673.47 ccw(c2994.29,679.13) 2999.95,684.78 2976.66,708.07 cw(c2982.32,713.73) 2976.66,719.39 cw(c2982.32,713.73) 2987.97,719.39 2995.75,711.61 ccw(c3001.41,717.26) 3007.07,711.61 ccw(c3001.41,717.26) 3007.07,722.92 cw(c3014.84,730.7) 3007.07,738.48 3026.39,757.8 3042.89,774.31 3725.48,774.31 3816.26,865.08 v1(3816.26,890.65)
CPU_SRAM_WE_N: R24.2 U2.11 U3.86 | length 1793.4
  Top Layer w11: v1(2967.22,1219.11) 2981.4,1233.29 2981.4,1347.47 3001.08,1367.15 R24.2@3001.08,1381.25 ; U3.86@3633.37,879.09 3688.15,879.09 v1(3701.93,892.87)
  Bottom Layer w11: v1(2967.22,1219.11) 2947.9,1199.78 2947.9,1131.94 2947.9,1107.31 3001.82,1053.38 ccw(c3009.6,1061.16) 3017.38,1053.38 3026.05,1062.05 cw(c3031.7,1056.4) 3037.36,1062.05 cw(c3031.7,1056.4) 3037.36,1050.74 3019.5,1032.88 ccw(c3025.15,1027.22) 3019.5,1021.56 ccw(c3025.15,1027.22) 3030.81,1021.56 3053.84,1044.6 cw(c3059.5,1038.94) 3065.16,1044.6 cw(c3059.5,1038.94) 3065.16,1033.28 3042.12,1010.25 ccw(c3047.78,1004.59) 3042.12,998.94 ccw(c3047.78,1004.59) 3053.44,998.94 3076.47,1021.97 cw(c3082.13,1016.31) 3087.79,1021.97 cw(c3082.13,1016.31) 3087.79,1010.66 3064.75,987.62 ccw(c3070.41,981.97) 3064.75,976.31 ccw(c3070.41,981.97) 3076.07,976.31 3099.1,999.34 cw(c3104.76,993.69) 3110.41,999.34 cw(c3104.76,993.69) 3110.41,988.03 3087.38,965 ccw(c3093.04,959.34) 3087.38,953.68 ccw(c3093.04,959.34) 3098.69,953.68 3121.73,976.72 cw(c3127.38,971.06) 3133.04,976.72 cw(c3127.38,971.06) 3133.04,965.4 3110.01,942.37 ccw(c3115.66,936.71) 3110.01,931.05 ccw(c3115.66,936.71) 3121.32,931.05 3144.35,954.09 cw(c3150.01,948.43) 3155.67,954.09 cw(c3150.01,948.43) 3155.67,942.77 3132.63,919.74 ccw(c3138.29,914.08) 3132.63,908.43 ccw(c3138.29,914.08) 3143.95,908.43 3166.98,931.46 cw(c3172.64,925.8) 3178.3,931.46 cw(c3172.64,925.8) 3178.3,920.15 3164.45,906.31 ccw(c3172.23,898.53) 3164.45,890.75 3175.77,879.44 3179.66,875.55 3202.9,852.31 3661.36,852.31 v1(3701.93,892.87)
CPU_UB: R25.2 U2.14 U3.85 | length 1392.5
  Top Layer w11: v1(2892.69,1381.25) R25.2@2922.34,1381.25 U2.14@2922.34,1304.63 ; v1(3573.6,892.23) 3592.9,892.23 3599.43,898.77 U3.85@3633.37,898.77
  Layer 2 w9.9: v1(2892.69,1381.25) 2892.69,1350.64 2925.02,1318.31 2945.68,1318.31 2983.98,1318.31 ccw(c2983.98,1328.21) 2993.88,1328.21 2993.88,1344.13 cw(c3001.33,1344.13) 3008.78,1344.13 3008.78,1318.66 ccw(c3016.23,1318.66) 3023.68,1318.66 3023.68,1345.92 cw(c3031.13,1345.92) 3038.58,1345.92 3038.58,1328.21 ccw(c3048.48,1328.21) 3048.48,1318.31 3068.33,1318.31 3487.48,1318.31 3573.6,1232.19 v1(3573.6,892.23)
CPU_USB#_D_N: D1.1 J3.3 R4.2 | length 1718.8
  Top Layer w9: D1.1@2453.56,1322.89 2462.84,1332.17 2492.9,1332.17 2498.18,1337.44 2498.18,1363.25 2520.59,1385.67 2604.86,1385.67 2613.83,1394.63 2613.83,1407.49 2612.4,1408.91 2612.4,1412.76 2609.03,1416.13 J3.3@2609.03,1434.83 ; R4.2@3668.2,1353.51 3670.7,1353.51 3684.78,1367.59 3684.78,1407.86 3684.78,1454.07 3677.47,1461.39 v1(3677.47,1465.34)
  Bottom Layer w9: v1(2460.44,1334.58) 2486.42,1334.58 2499.69,1347.85 2499.69,1366.8 2524.17,1391.28 2671.72,1391.28 2715.88,1347.11 3604.31,1347.11 3684.78,1427.58 v1@3684.78,1465.34
CPU_USB#_D_P: D1.6 J3.2 R3.2 | length 1715.3
  Top Layer w9: D1.6@2545.65,1325.29 2538.77,1332.17 2519.45,1332.17 2514.18,1337.44 2514.18,1356.62 2527.22,1369.67 2611.49,1369.67 2629.83,1388.01 2629.83,1407.49 2631.25,1408.91 2631.25,1412.76 2634.62,1416.13 J3.2@2634.62,1434.83 ; v1(3708.09,1465.34) 3708.09,1461.39 3700.78,1454.07 3700.78,1401.23 3700.78,1367.59 3714.86,1353.51 R3.2@3717.36,1353.51
  Bottom Layer w9: v1(2554.94,1334.58) 2528.96,1334.58 2515.69,1347.85 2515.69,1360.17 2530.8,1375.28 2596.1,1375.28 2608.93,1362.45 2632.12,1362.45 2644.95,1375.28 2665.09,1375.28 2709.25,1331.11 3610.94,1331.11 3700.78,1420.95 v1@3700.78,1465.34
CPU_USB_D_N: R3.1 U3.74 | length 164.3
  Top Layer w9: R3.1@3717.36,1293.51 3700.78,1276.93 3700.78,1242.6 3720.11,1223.27 3720.11,1146.68 U3.74@3721.95,1144.84
CPU_USB_D_P: R4.1 U3.75 | length 164.3
  Top Layer w9: R4.1@3668.2,1293.51 3684.78,1276.93 3684.78,1235.97 3704.11,1216.64 3704.11,1146.68 U3.75@3702.26,1144.84
GND: C1.1 C2.2 C3.2 C5.2 C8.1 C11.1 C14.1 C17.1 C19.1 C21.1 C22.1 C23.1 C25.1 C26.1 C27.1 C28.1 C29.1 C30.1 C31.1 C32.1 C33.1 C34.1 C35.1 C36.1 C37.1 C38.2 C39.1 C40.1 C41.1 C42.1 C43.1 C44.1 C45.1 C46.1 C47.1 C48.1 C49.1 C50.1 C51.1 C52.1 C53.1 C54.1 C55.1 C56.1 C57.1 C58.1 D1.2 J1.2 J2.2 J3.5 J5.6 J6.6 J7.6 J8.6 J9.6 J10.6 J11.6 J12.6 J13.6 J14.6 J15.6 J16.6 J17.6 LED1.2 LED2.2 Q2.2 R2.1 R10.1 R11.1 R13.1 R14.1 R26.1 SW1.1 U1.5 U2.27 U2.46 U3.16 U3.32 U3.58 U3.83 U5.25 U5.26 U5.33 X2.2 X2.4 | length 2439.2
  Top Layer w7: C48.1@113.74,650.19 v1@113.74,678.92 ; J13.6@152.01,186.5 v1(152.01,234.41) ; v1@302.15,656.39 C53.1@330.88,656.39 ; v1(436.3,1069.2) J14.6@436.3,1117.12 ; v1@465,624.16 C51.1@465,652.89 ; C47.1@714.22,647.89 v1@714.22,676.62 ; J12.6@752.01,186.5 v1(752.01,234.41) ; v1@903.96,656.78 C54.1@932.69,656.78 ; v1(1036.3,1069.2) J15.6@1036.3,1117.12 ; v1@1068.05,625.54 C52.1@1068.05,654.27 ; C41.1@1323.15,649.29 v1@1323.15,678.02 ; J11.6@1352.01,186.5 v1(1352.01,234.41) ; v1@1499.4,655.77 C57.1@1528.13,655.77 ; v1(1636.3,1069.2) J16.6@1636.3,1117.12 ; v1@1666.17,625.54 C55.1@1666.17,654.27 ; C40.1@1921.87,650.28 v1@1921.87,679.01 ; J10.6@1953.47,186.5 v1(1953.47,234.41) ; v1@2100.85,655.76 C58.1@2129.58,655.76 ; v1(2237.75,1069.2) J17.6@2237.75,1117.12 ; v1@2267.62,623.71 C56.1@2267.62,652.44 ; U5.25@2447.35,768.92 2447.35,795.89 2461.72,810.26 2467.03,810.26 U5.26@2467.03,768.92 ; R13.1@2810.6,387 2813.33,389.73 v1(2813.33,410.62) ; C26.1@4364,965.71 v1(4393.03,965.71)
  Top Layer w8: C46.1@2595.18,613.6 2595.77,613.02 2625.64,613.02 v1(2626.23,612.43) ; C39.1@2633.83,380.59 C39.1@2634.01,380.78 ; U2.27@2764.86,536.92 2764.86,591.06 v1(2765.87,591.06) ; C2.2@2994.87,418.39 2994.87,440.28 2997.37,442.78 2994.87,445.28 C3.2@2994.87,456.78 ; U2.46@3138.88,536.92 3138.88,488.19 3152.27,474.8 v1(3153.03,474.8) ; R2.1@3418,456.31 3418,434.34 v1(3418.54,433.81) ; v1(3874.71,491.12) 3874.71,468.36 C22.1@3877.03,466.05 ; C5.2@3948.87,1327.53 v1(3978.15,1327.53) ; v1(3997.54,433.68) C23.1@3997.54,466.05 U3.16@3997.54,534.6 ; C21.1@4017.22,1245.84 4018.42,1244.64 C19.1@4056.59,1244.64 4056.59,1267.5 v1(4056.87,1267.78) ; U3.58@4036.91,1144.84 4036.91,1107.43 4073.45,1070.89 v1(4073.45,1036.57) ; U3.32@4243.6,721.61 4282.08,721.61 4299.4,738.92 4372.33,738.92 v1(4373.72,740.31) ; v1(4275.93,572.98) C29.1@4305.5,572.98 ; C28.1@4305.5,462.77 v1(4335.07,462.77) ; C32.1@4433.97,381.28 v1(4433.97,410.85)
  Top Layer w12: v1@3515.47,1067.77 3534.39,1048.85 C8.1@3534.4,1016.89 ; R14.1@4383.22,1482.72 v1(4416.74,1482.72)
  Top Layer w20: J13.6@152.01,181.27 v1(152.01,234.41) ; v1(436.3,1069.2) J14.6@436.3,1122.35 ; J12.6@752.01,181.27 v1(752.01,234.41) ; v1(1036.3,1069.2) J15.6@1036.3,1122.35 ; J11.6@1352.01,180.59 v1@1352.01,233.74 ; v1(1636.3,1069.2) J16.6@1636.3,1122.35 ; J10.6@1953.47,180.59 v1@1953.47,233.74 ; v1(2237.75,1069.2) J17.6@2237.75,1122.35 ; J9.6@2597.26,-111.1 v1(2597.26,-57.95) ; J8.6@3197.69,-111.1 v1(3197.69,-57.95) ; J7.6@3798.13,-111.1 v1(3798.13,-57.95) ; J6.6@4394.59,-111.1 v1(4394.59,-57.95)
  Bottom Layer w20: J1.2@4806.39,1266.78 J1.2@4851.87,1266.78
  other v1: 3304.28,421.28 2995.37,440.78 465.31,624.16 2267.93,623.71 1068.36,625.54 1666.48,625.54 302.15,656.07 1499.4,655.46 2100.85,655.45 903.96,656.47 713.91,676.62 1322.83,678.02 113.43,678.92 1921.56,679.01 2550.9,830.25 2475.9,832.25 4590.35,836.72 2550.9,889.31 2475.9,891.31 3504.4,892.87 4457.99,897.57 3514.47,1067.77 2421.55,1184.1 3467.62,1204.98 2421.55,1285.49 4898.87,1315.31 2556.87,1469.48 2962.3,1477.07 4295.26,1486.46 4295.26,1546.78 4184.47,1553.79
HFXTAL_CPU_CLK_N: C31.2 U3.43 X2.3 | length 370.7
  Top Layer w7: U3.43@4243.6,938.14 4543.48,938.14 4569.09,912.53 X2.3@4569.09,882.39 ; X2.3@4567.52,880.81 X2.3@4569.09,882.39 ; X2.3@4570.66,883.96 X2.3@4569.09,882.39
HFXTAL_CPU_CLK_P: C30.2 U3.42 X2.1 | length 277.6
  Top Layer w7: U3.42@4243.6,918.46 4243.76,918.62 4394.06,918.62 4408.86,903.82 4408.86,861.33 4431.49,838.69 C30.2@4459.25,838.69 ; X2.1@4508.46,833.57 X2.1@4512.4,833.57
I2C0_SCL: R33.2 U3.19 U5.29 | length 2270.6
  Top Layer w7: v1(2525.54,723.02) 2525.81,723.3 2525.81,768.64 U5.29@2526.09,768.92 ; U3.19@4056.59,534.6 4056.59,577.74 v1(4074.63,595.78) ; R33.2@4215.48,469.55 4252.64,469.55 v1(4252.87,469.78)
  Layer 1 w7: v1(2525.54,723.02) 2525.87,722.69 2525.87,626.93 2803.49,349.31 3856.25,349.31 4074.63,567.69 v1(4074.63,595.78)
  Bottom Layer w7: v1(4074.63,595.78) 4074.63,579.82 4142.67,511.78 4184.67,469.78 v1(4252.87,469.78)
I2C0_SDA: R32.2 U3.18 U5.30 | length 2200.3
  Top Layer w7: U5.30@2545.77,768.92 2545.77,733.87 2550.16,729.48 v1(2550.16,704.82) ; v1(4018.87,595.78) 4036.91,577.74 U3.18@4036.91,534.6 ; v1(4149.87,469.78) 4150.1,469.55 R32.2@4181.15,469.55
  Layer 1 w7: v1(2550.16,704.82) 2550.87,704.11 2550.87,621.73 2808.1,364.5 3851.64,364.5 4018.87,531.73 v1(4018.87,595.78)
  Bottom Layer w7: v1(4018.87,595.78) 4018.87,493.52 4042.61,469.78 v1(4149.87,469.78)
INT_EXP: R18.1 R45.1 U5.32 | length 1641.1
  Top Layer w7: U5.32@2585.14,768.92 2612.11,768.92 2637.05,743.98 v1(2637.05,707.57) R45.1@2637.05,687.6
  Top Layer w8: v1(3882.9,427.31) 3886.86,431.27 R18.1@3912.89,431.27
  Layer 1 w7: v1(2637.05,707.57) 2684.18,660.44 2684.18,508.22 2813.09,379.31 3834.9,379.31 v1(3882.9,427.31)
LFXTAL_CPU_CLK_N: C29.2 U3.25 X1.4 | length 189.9
  Top Layer w7: U3.25@4174.7,534.6 4304.12,534.6 C29.2@4305.5,535.98 4362.2,535.98 X1.4@4363.48,534.7
LFXTAL_CPU_CLK_P: C28.2 U3.24 X1.1 | length 240.5
  Top Layer w7: U3.24@4155.02,534.6 4155.02,504.55 4159.8,499.77 C28.2@4305.5,499.77 X1.1@4363.48,499.77
MIC_CPU_DATA: C6.2 U3.53 | length 682.3
  Top Layer w8: U3.53@4135.33,1144.84 v1(4135.33,1278.04)
  Layer 1 w8: v1(4135.33,1278.04) 4491.63,1278.04 4574.9,1361.31 v1(4649.9,1361.31)
MODE: C17.2 R31.1 SW1.3 U3.46 | length 1171.9
  Top Layer w8: R31.1@3283.68,1264.81 3283.68,1230.3 3294.17,1219.81 3392,1219.81 3466.97,1144.84 v1(3609.74,1144.84) ; v1(4185.9,995.31) 4187.79,997.2 U3.46@4243.6,997.2
  Bottom Layer w8: v1(3609.74,1144.84) 3761.32,1144.84 3800.69,1105.47 3800.69,995.14 3818.33,977.5 4168.09,977.5 v1(4185.9,995.31)
NetC5_1: C5.1 Q4.4 U1.3 | length 594.1
  Top Layer w12: Q4.4@4383.22,1291 v1@4383.22,1326.07
  Top Layer w20: C5.1@3948.87,1422.02 3948.87,1383.86 3958.78,1373.95 v1(3997.54,1373.95) U1.3@4060.46,1373.95
  Layer 2 w20: v1(3997.54,1373.95) 4334.98,1373.95 v1(4382.86,1326.07)
NetC6_1: C6.1 J4.2
NetC10_2: C10.2 U4.1 | length 68.4
  Top Layer w7: U4.1@4765.15,1141.58 C10.2@4833.58,1141.58
NetC16_2: C16.2 R28.1 U3.47 | length 431.4
  Top Layer w8: U3.47@4243.6,1016.88 4244.84,1015.64 4274.71,1015.64 4281.13,1009.22 v1(4285.36,1009.22) ; R28.1@4518.15,1182.3 v2(4518.15,1198.74) C16.2@4518.15,1215.19
  Layer 1 w10: v1(4285.36,1009.22) 4355.23,1079.09 4470.69,1079.09 4518.15,1126.56 v2(4518.15,1198.74)
NetC18_2: C18.2 R29.1 U3.50 | length 490.2
  Top Layer w8: U3.50@4243.6,1075.94 v2(4243.6,1100.33) ; R29.1@4558.53,1182.3 v2(4558.53,1199.34) C18.2@4558.52,1216.38
  Layer 1 w10: v2(4243.6,1100.33) 4453.1,1100.33 4479.32,1126.54 4479.32,1212.67 4496.59,1229.95 4527.92,1229.95 v2(4558.53,1199.34)
NetC20_2: C20.2 R30.1 U3.52 | length 423.6
  Top Layer w8: U3.52@4155.02,1144.84 4155.02,1205.34 4166.79,1217.12 v2(4166.79,1217.84) ; R30.1@4445.14,1145.97 v2(4445.14,1169.68) C20.2@4445.14,1189.9 C20.2@4445.14,1193.4
  Layer 1 w10: v2(4166.79,1217.84) 4396.98,1217.84 v2(4445.14,1169.68)
NetC21_2: C21.2 U3.59 | length 64
  Top Layer w8: U3.59@4017.22,1144.84 C21.2@4017.22,1208.84
NetC24_2: C24.2 U3.49 | length 200.2
  Top Layer w8: U3.49@4243.6,1056.25 4285.47,1056.25 4292.99,1063.78 C24.2@4440.68,1063.78
NetC45_2: C45.2 C46.2 R44.1 R45.2 R46.2 U5.27 U5.31 | length 2261
  Top Layer w7: U5.27@2486.72,768.92 2486.72,741.71 2441.18,696.18 2441.18,666.33 2449.95,657.57 2465.38,657.57 R46.2@2472.35,650.6 C45.2@2516.24,650.6 2573.21,650.6 2577.37,654.76 2577.37,725.38 2565.46,737.29 U5.31@2565.46,768.92 ; 2586.18,659.6 2586.18,656.1 2591.68,650.6 C46.2@2595.18,650.6 2608.68,650.6 ; 2623.86,650.6 R45.2@2637.05,650.6 ; v1@3434.43,1126.78 v1(3434.9,1126.31)
  Top Layer w10: 2552.95,651.85 2623.86,651.85 2628.08,656.07 R45.2@2636.52,656.07 ; R45.2@2637.05,650.6 2668.66,650.6 2682.93,664.88 2682.93,710.93 2760.31,788.31 v1(2760.31,897.84) ; R44.1@3401,1126.78 v1@3434.43,1126.78
  Bottom Layer w10: v1(2760.31,897.84) 2760.31,992.07 2561.64,1190.74 2561.64,1244.13 2578.54,1261.02 3357.69,1261.02 3434.9,1183.82 v1(3434.9,1126.31)
NetD1_5: D1.5 FB1.2 J3.1
NetFB2_1: FB2.1 Q1.3
NetFB2_2: FB2.2 R9.2
NetFB3_1: FB3.1 R27.1 | length 70.6
  Top Layer w9: R27.1@4412.86,1005.07 4412.86,987.21 4422.55,977.51 FB3.1@4461.62,977.51
NetFB4_1: FB4.1 Q5.3
NetFB4_2: FB4.2 R39.2
NetFB5_1: FB5.1 Q6.3
NetFB5_2: FB5.2 R44.2
NetJ4_1: J4.1 Q3.3
NetLED1_1: LED1.1 R20.1
NetLED2_1: LED2.1 R34.1
NetQ2_3: Q2.3 R6.1
NetQ4_3: Q4.3 R14.2 R16.2
NetR7_2: R7.2 R8.2 U2.45 | length 586.5
  Top Layer w7: v1(3119.19,475.62) U2.45@3119.19,536.92
  Top Layer w8: v1(3465.03,493.31) R8.2@3495.9,493.31 R7.2@3534.9,493.31
  Layer 1 w7: v1(3119.19,475.62) 3198.03,396.78 3431.37,396.78 3446.37,411.78 3446.37,474.65 v1(3465.03,493.31)
NetR12_2: R12.2 R13.2 R17.1
NetR17_2: R17.2 U2.47 | length 481.1
  Top Layer w7: R17.2@2849.97,387 v1(2849.97,407.89) ; U2.47@3158.56,536.92 3158.56,500.83 v1(3183.76,475.62)
  Bottom Layer w7: v1(2849.97,407.89) 3161.48,407.89 3183.76,430.17 v1(3183.76,475.62)
NetR18_2: R18.2 U3.14 | length 97.6
  Top Layer w7: R18.2@3912.89,468.27 3912.89,480.77 3922.9,490.78 3944.26,490.78 3958.17,504.68 U3.14@3958.17,534.6
NetR19_2: R19.2 U3.15 | length 76.9
  Top Layer w7: R19.2@3952.26,468.28 3977.85,493.87 U3.15@3977.85,534.6
NetR20_2: R20.2 U3.39 | length 1578.9
  Top Layer w7: v1(4827.9,808.31) 4854.9,808.31 4865.66,797.54 R20.2@4865.66,768.31
  Top Layer w8: v1(4014.9,892.87) 4181.25,892.87 4214.72,859.4 U3.39@4243.6,859.4
  Bottom Layer w7: v1(4014.9,892.87) 4014.9,746.73 4210.96,550.67 4771.32,550.67 4827.9,607.24 v1(4827.9,808.31)
NetR34_2: R34.2 U3.23 | length 934.8
  Top Layer w7: v1(4134.87,578.85) 4135.33,579.31 U3.23@4135.33,534.6 ; R34.2@4865.66,645 v1(4865.66,675.74)
  Bottom Layer w7: v1(4134.87,578.85) 4177.05,536.67 4816.76,536.67 4865.66,585.57 v1(4865.66,675.74)
OPAMP1_OPAMP2_DATA: C24.1 U3.40 | length 602.5
  Top Layer w7: C24.1@4548.16,1063.78 C24.1@4549.16,1062.78
  Top Layer w8: U3.40@4243.6,879.09 4286.99,879.09 4293.9,872.18 v1(4293.9,850.59)
  Top Layer w12: C24.1@4549.16,1054.78 v1(4596.16,1054.78)
  Layer 1 w7: v1(4293.9,850.59) 4536.18,850.59 4596.16,910.57 v1@4596.16,1062.78
PMOD_IO1: J1.6 U3.26 | length 812.7
  Top Layer w8: U3.26@4243.6,603.5 4244.41,602.69 4496.3,602.69 v1(4497.11,601.89)
  Bottom Layer w8: v1(4497.11,601.89) 4498.99,603.78 4662.37,603.78 4719.05,660.45 4719.05,814.95 4764.87,860.78 4851.87,860.78 J1.6@4851.87,866.78
PMOD_IO2: J1.5 U3.27 | length 895.8
  Top Layer w8: U3.27@4243.6,623.18 4345.09,623.18 4354.42,632.51 4428.1,632.51 v1(4497.11,632.51)
  Bottom Layer w8: v1(4497.11,632.51) 4653.61,632.51 4694.81,673.71 4694.81,921.69 4739.9,966.78 J1.5@4851.87,966.78
PMOD_IO3: J1.4 U3.63 | length 1213.4
  Top Layer w8: U3.63@3938.48,1144.84 3938.48,1240.58 v1(3986.05,1288.14)
  Bottom Layer w8: v1(3986.05,1288.14) 3986.05,1230.73 4076.28,1140.49 4258.47,1140.49 4387.44,1011.52 4676.88,1011.52 4748.35,1083 4835.65,1083 J1.4@4851.87,1066.78
PMOD_IO4: J1.3 U3.62 | length 1183.7
  Top Layer w8: U3.62@3958.17,1144.84 3958.17,1219.6 4012.27,1273.7 4017.3,1273.7 4017.3,1278.04 v1(4017.59,1278.04)
  Bottom Layer w8: v1(4017.59,1278.04) 4017.59,1229.88 4087.54,1159.94 4264.55,1159.94 4395.56,1028.92 4627.41,1028.92 4765.26,1166.78 J1.3@4851.87,1166.78
REF_CPU_OUT: C15.2 R28.2 R29.2 R30.2 U4.5 U4.6 | length 449.7
  Top Layer w10: R30.2@4485.14,1142.97 4485.14,1129.12 4493.48,1120.78 4626.15,1120.78 4646.11,1100.82 4658.01,1100.82 4662.01,1096.82 C15.2@4662.01,1093.78 C15.2@4662.01,1096.28
  Top Layer w12: R30.2@4485.14,1142.97 R30.2@4482.14,1145.97 4582.27,1145.97 4615.28,1178.98 U4.5@4662.01,1178.98 ; C15.2@4662.01,1096.28 C15.2@4662.01,1097.28 ; C15.2@4662.01,1100.28 U4.6@4662.01,1141.58
RST_EXP: R19.1 R46.1 U5.28 | length 1815.2
  Top Layer w7: v1@2501.08,687.92 2501.08,687.6 R46.1@2472.35,687.6 2472.37,707.57 2506.4,741.6 U5.28@2506.4,768.92
  Top Layer w8: v1(3952.26,403.24) R19.1@3952.26,431.28
  Layer 1 w7: v1@2501.08,687.92 2502.08,686.92 2502.08,630.92 2803.16,329.84 3856.59,329.84 3862.05,335.31 3867.98,341.24 3929.98,403.24 v1(3952.26,403.24)
  other v1: 2502.08,687.92